# Altium PCB Light_SPT_Device_v1.0.PcbDoc (part 1 of 4)
Units mil, origin at the board's own origin, x right, y up, seen from the top; angles counter-clockwise.
Board outline 3454 x 2460 mil, 2 copper layers (Top Layer, Bottom Layer), stack 57 mil thick; 156 components, 115 nets, 552 pads, 270 vias.
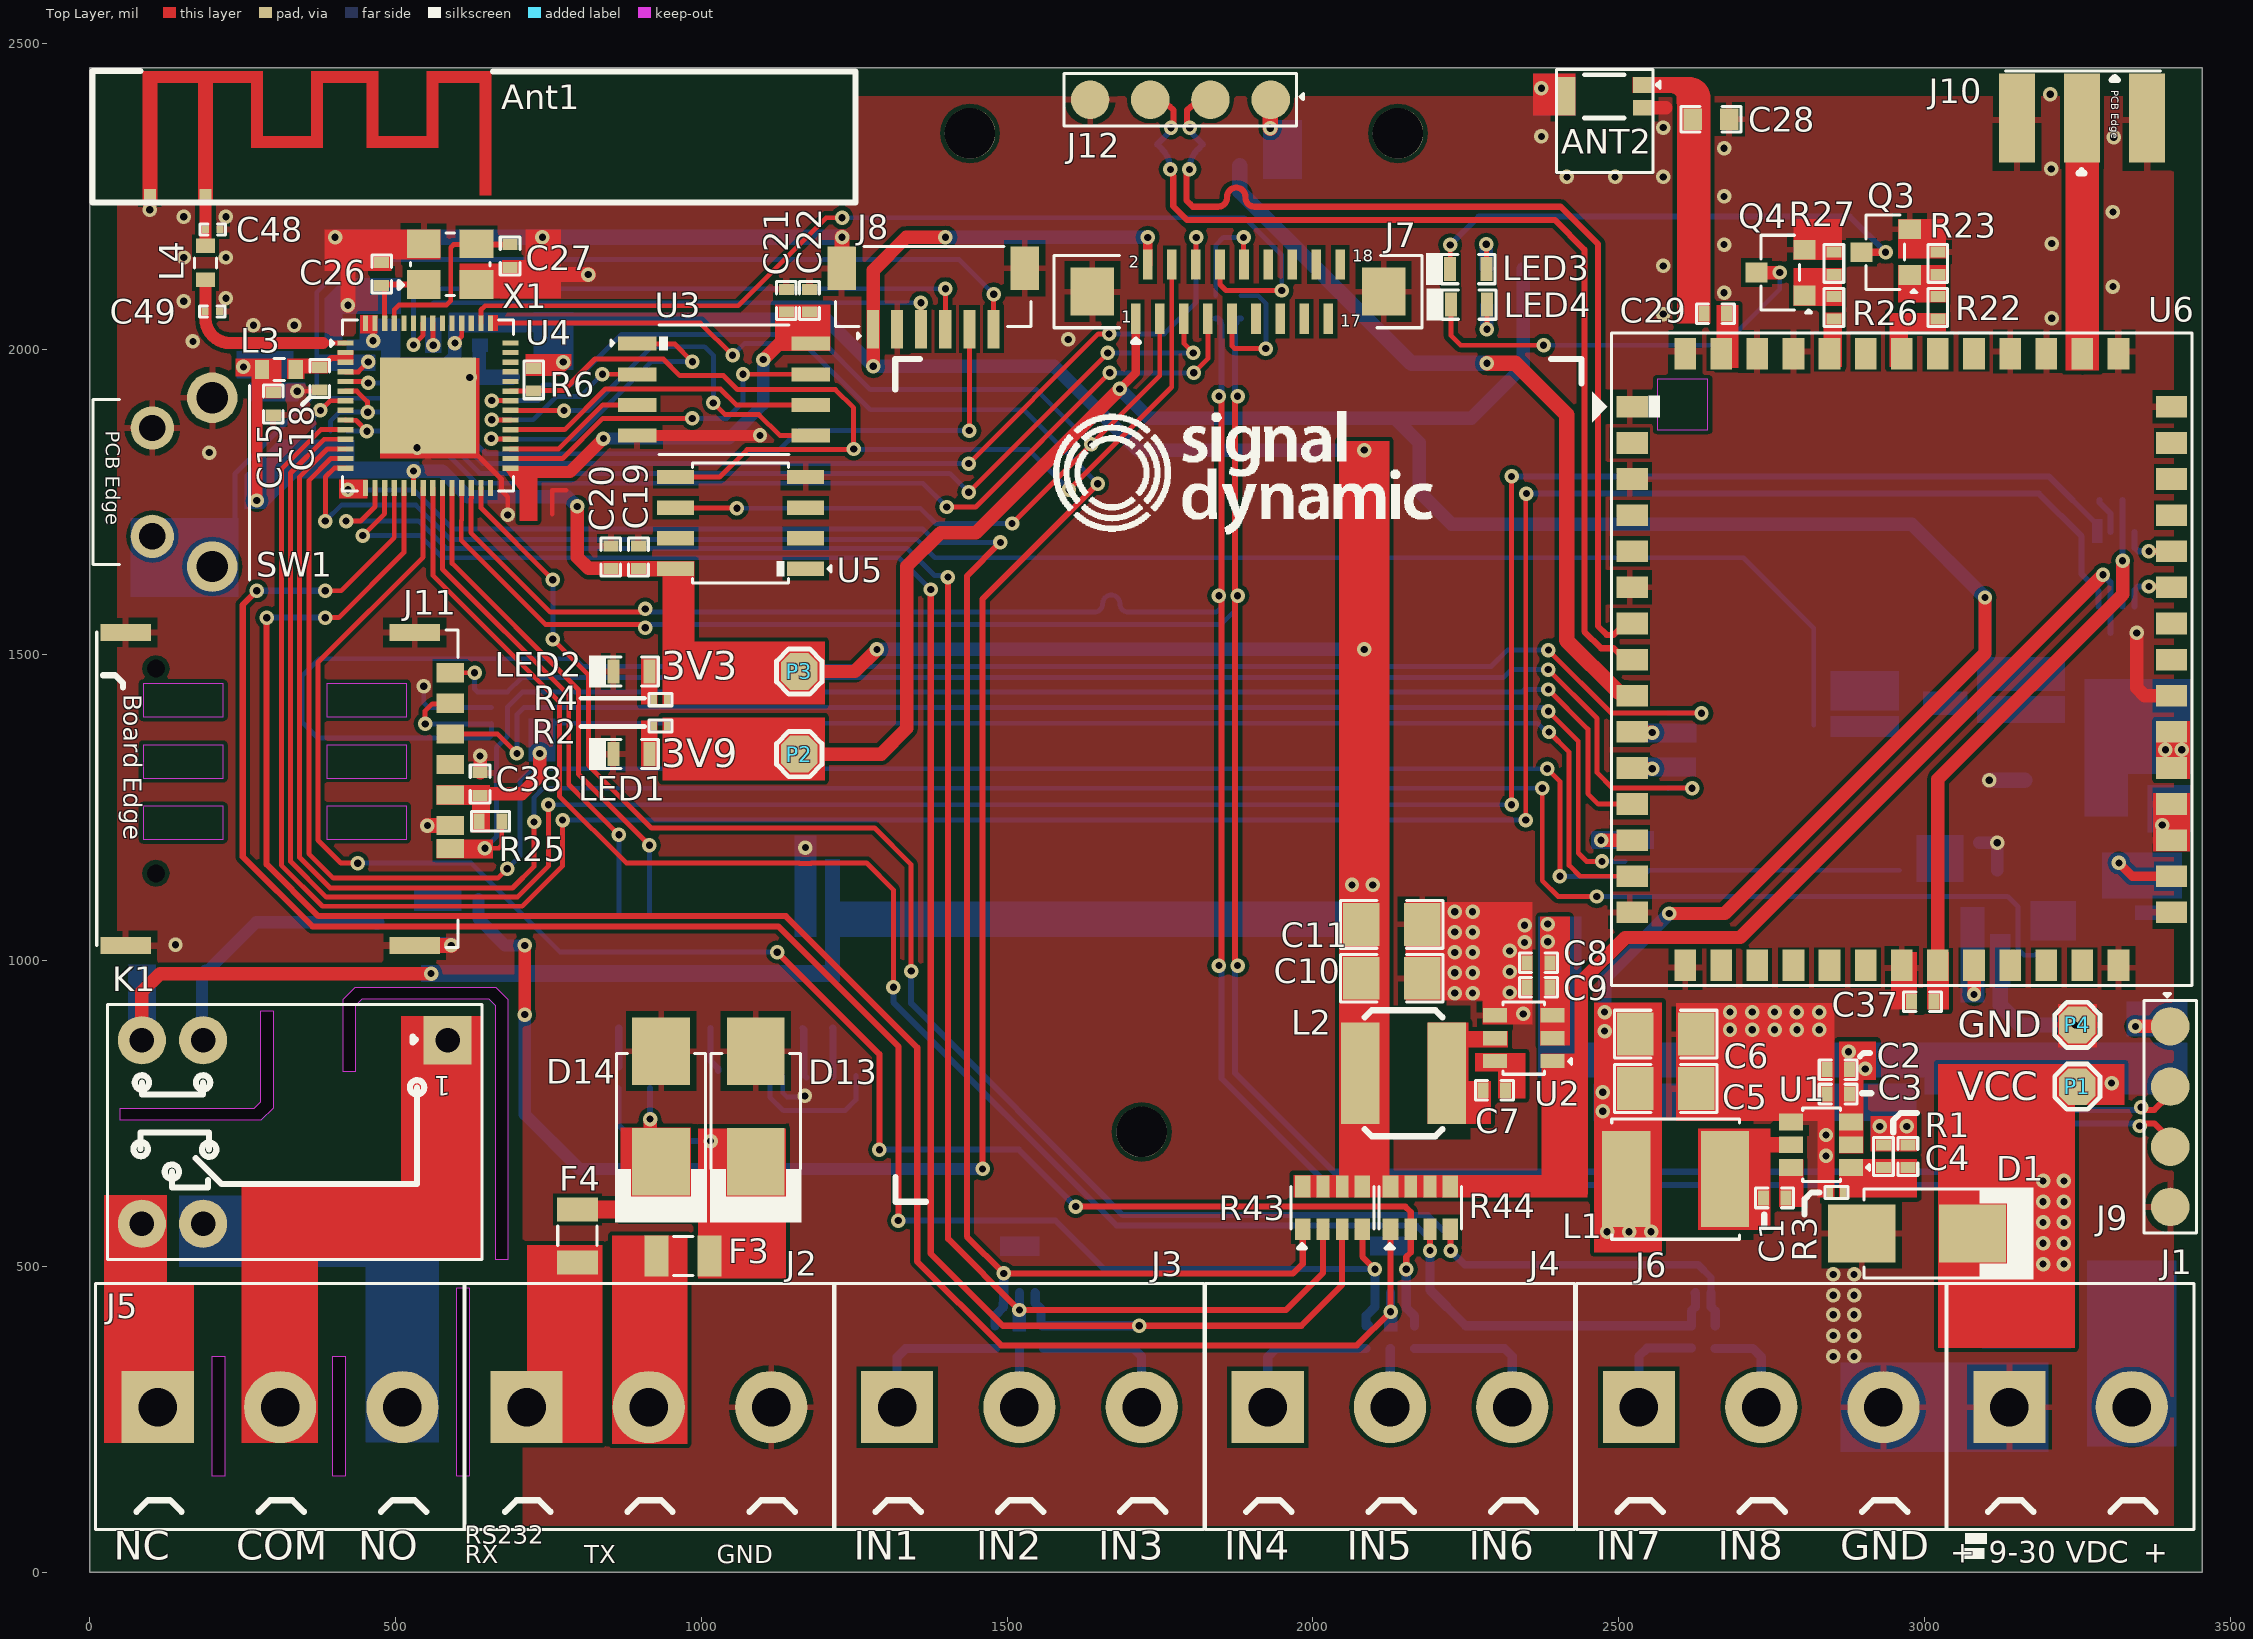
[diagram p0: Top Layer view]
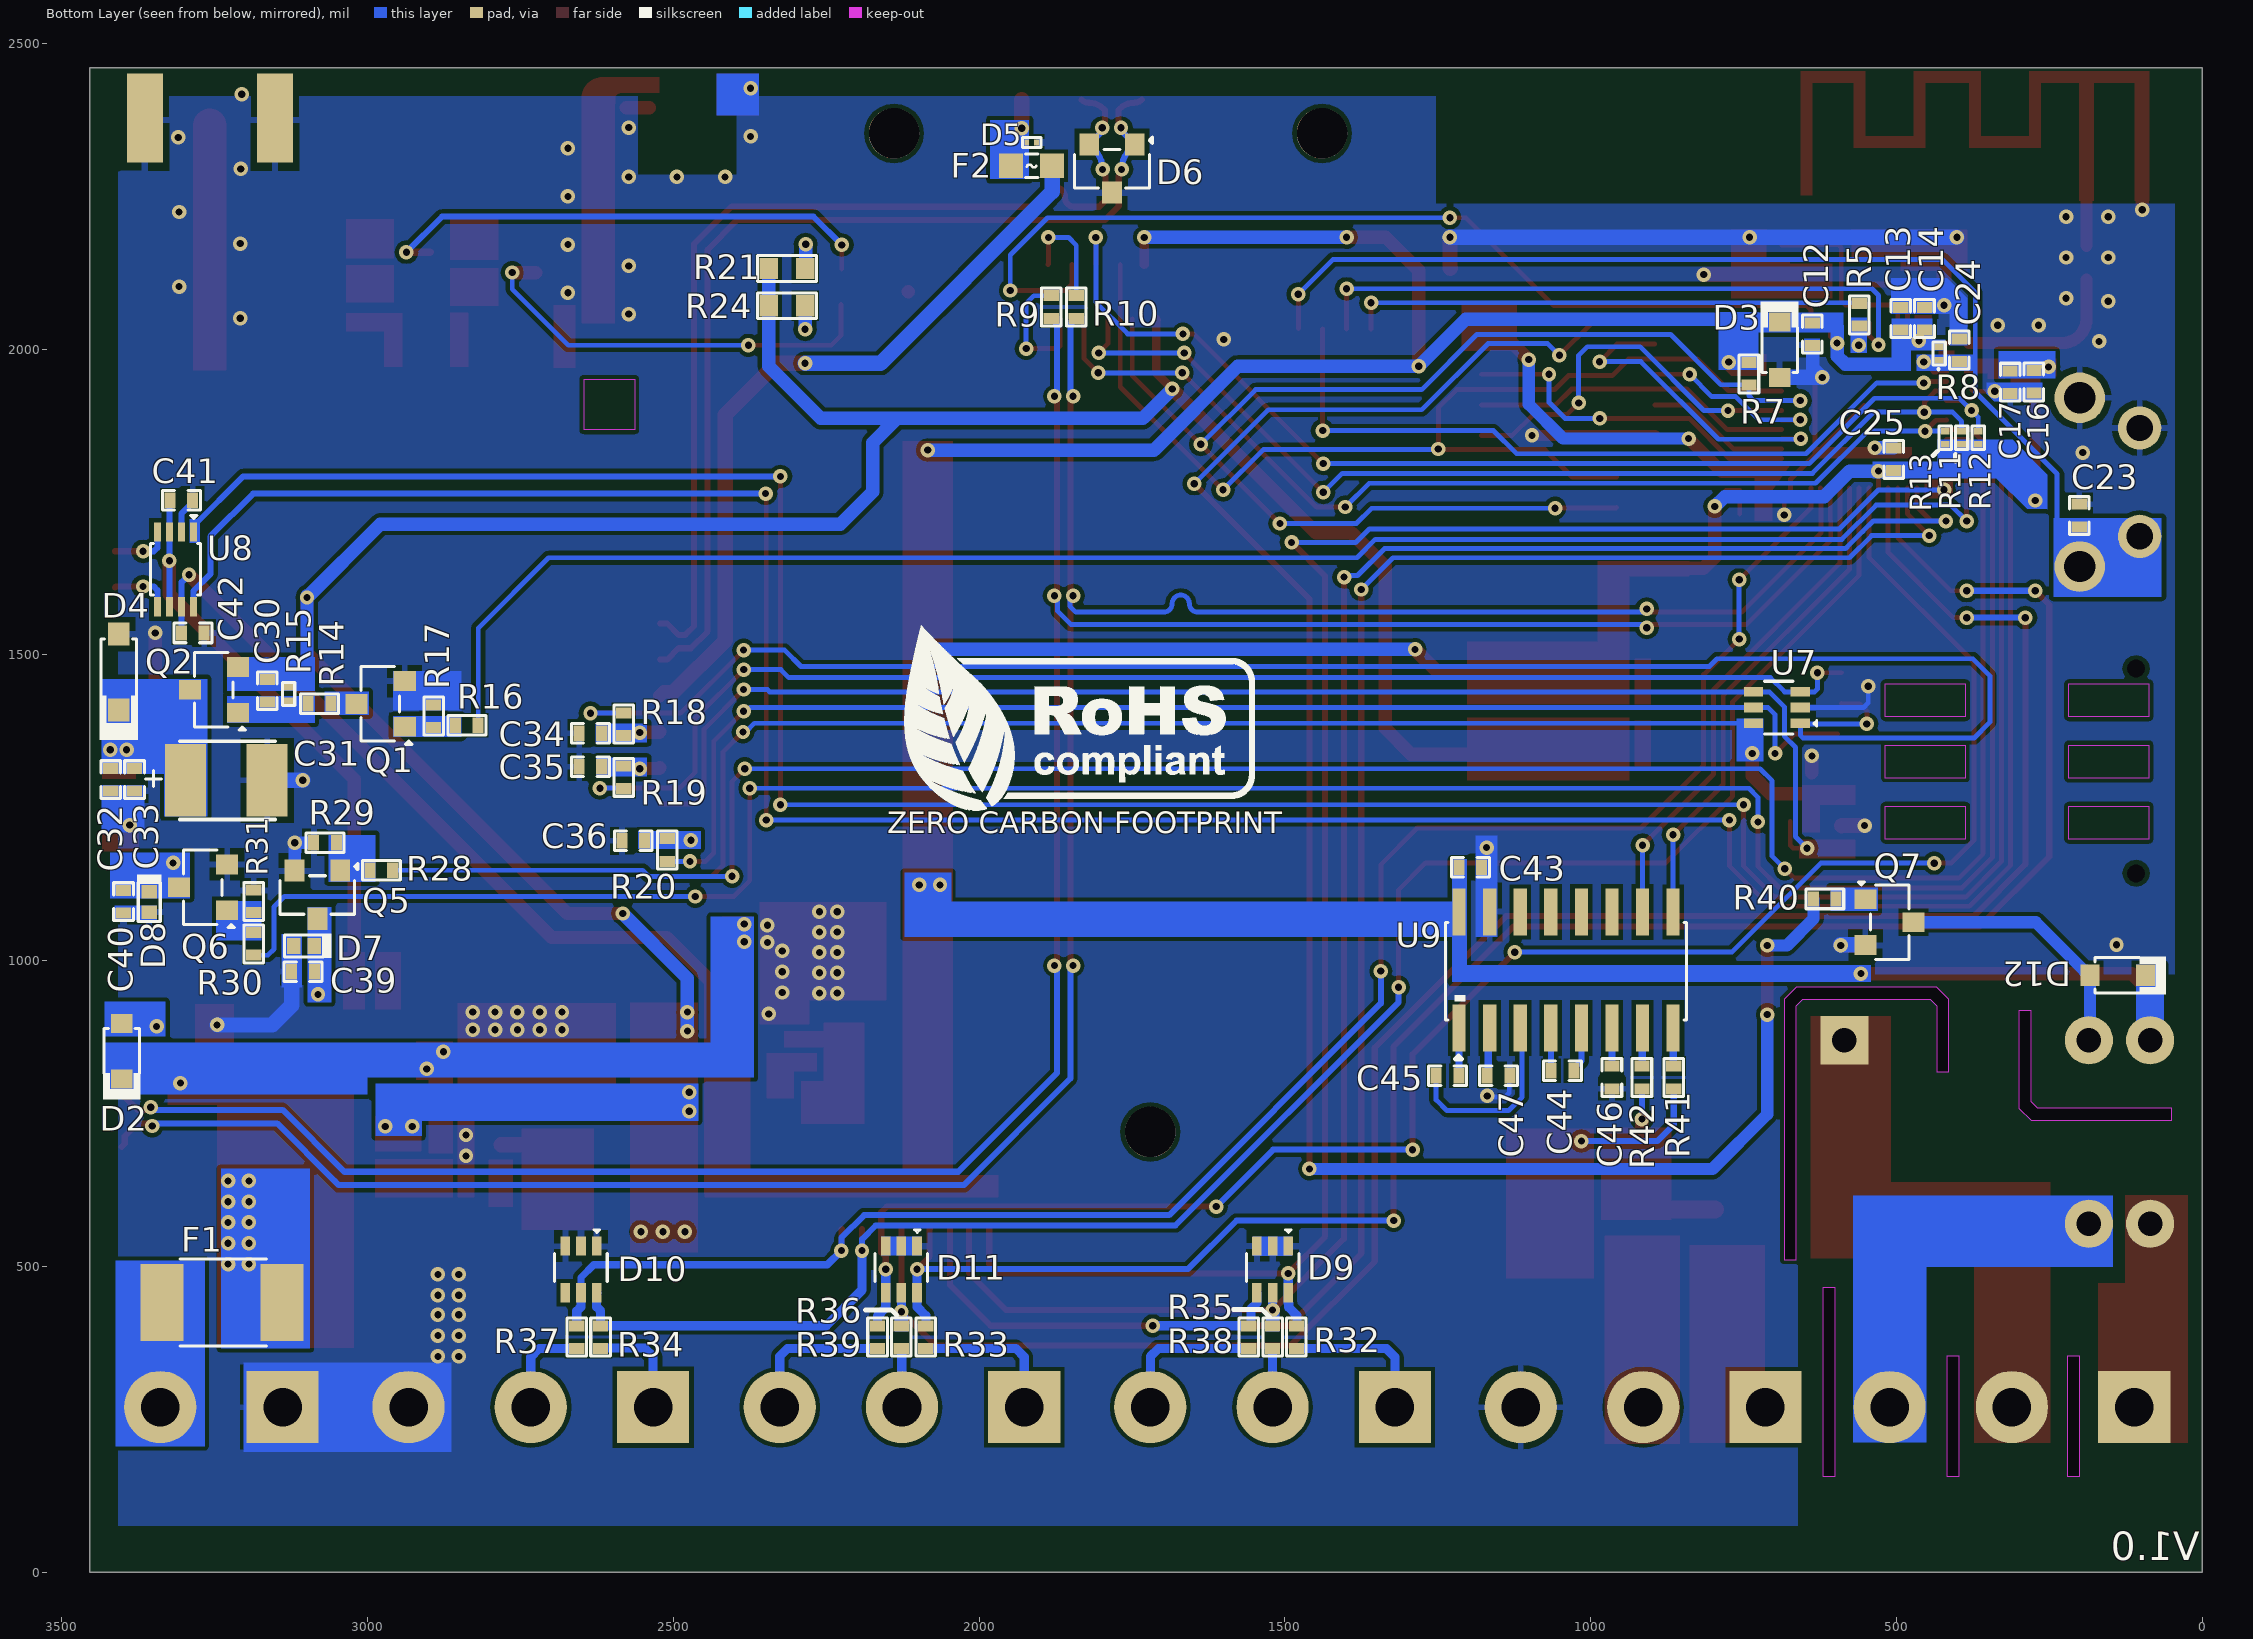
[diagram p1: Bottom Layer view, seen from below]

## Layer stack, top to bottom
Top Solder: solder mask 3, Solder Resist, Dk 3.5
Top Layer: signal copper 10
Dielectric 1: core 37, FR-4, Dk 4.8
Bottom Layer: signal copper 10
Bottom Solder: solder mask 3, Solder Resist, Dk 3.5

## Board outline
0,0 0,2460 3454,2460 3454,0
cut-out: 600.26,157 600.26,465 620.26,465 620.26,157
cut-out: 414.04,818.13 414.04,937.13 433.9,957 663.78,957 683.65,937.13 683.65,511 663.65,511 663.65,926.77 653.28,937.13 444.4,937.13 434.04,926.77 434.04,818.13
cut-out: 49.76,739 49.76,758.87 269.14,758.87 279.5,769.23 279.5,917.82 299.5,917.82 299.5,758.87 279.64,739
cut-out: 220.26,157 200.26,157 200.26,353 220.26,353
cut-out: 417.26,157 397.26,157 397.26,353 417.26,353

## Design rules (kind name [scope] priority, off if disabled: settings)
Clearance [All] p1: gap=7 ignorepadtopadclearanceinfootprint=FALSE except(0: Arc-Hole Track-Hole SMDPad-Hole THPad-Hole Via-Hole Fill-Hole Poly-Hole Region-Hole Text-Hole; 4: Arc-SMDPad Track-SMDPad SMDPad-SMDPad)
DiffPairsRouting USB_DIFF_Routes [InDifferentialPairClass('USB_DIFF_Lines')] p1: maxlimit=12 minlimit=12 mostfreqgap=12 toplayer_minwidth=8 toplayer_maxwidth=10 toplayer_prefwidth=10 bottomlayer_minwidth=8 bottomlayer_maxwidth=10 bottomlayer_prefwidth=10 maxuncoupledlength=500
DiffPairsRouting GSM_USB_Routes [InDifferentialPairClass('GSM_USB_Lines')] p2: maxlimit=12 minlimit=12 mostfreqgap=12 toplayer_minwidth=10 toplayer_maxwidth=10 toplayer_prefwidth=10 bottomlayer_minwidth=10 bottomlayer_maxwidth=10 bottomlayer_prefwidth=10 maxuncoupledlength=500
DiffPairsRouting [All] p3: maxlimit=5 minlimit=5 mostfreqgap=12 toplayer_minwidth=9.5 toplayer_maxwidth=9.5 toplayer_prefwidth=10 bottomlayer_minwidth=9.5 bottomlayer_maxwidth=9.5 bottomlayer_prefwidth=10 impedanceprofiledriven=TRUE impedanceprofileid={B3DCD015-1AF6-4112-AD1C-EA45046023D8} impedanceprofilevalue=90.000000 maxuncoupledlength=500
MatchedLengths "Schematic Matched Net Lengths_1" [InNetClass('GSM_USB')] p1: tolerance=20 checknetsindiffpair=TRUE checkdiffpairvsdiffpair=FALSE checkxsignals=FALSE checkothers=FALSE
MatchedLengths "Schematic Matched Net Lengths" [InNetClass('USB_DIFF')] p2: tolerance=20 checknetsindiffpair=TRUE checkdiffpairvsdiffpair=FALSE checkxsignals=FALSE checkothers=FALSE
MaxMinImpedance "Schematic Impedance Constraint_1" [InNetClass('GSM_USB')] p1: minimum=88.00 maximum=90.00
MaxMinImpedance "Schematic Impedance Constraint" [InNetClass('USB_DIFF')] p2: minimum=85.00 maximum=95.00
MinimumSolderMaskSliver [All] p1: minsoldermaskwidth=0
PolygonConnect [All] p1: thpad.connectstyle=Relief thpad.reliefconductorwidth=10 thpad.reliefentries=4 thpad.polygonreliefangle="90 Angle" thpad.airgapwidth=10 smdpad.connectstyle=Relief smdpad.reliefconductorwidth=10 smdpad.reliefentries=4 smdpad.polygonreliefangle="90 Angle" smdpad.airgapwidth=10 via.connectstyle=Direct via.reliefconductorwidth=10 via.reliefentries=4 via.polygonreliefangle="90 Angle" via.airgapwidth=10
RoutingVias [All] p1: holewidth=11.81 width=23.62 viastyle="Through Hole" minholewidth=11.81 minwidth=23.62 maxholewidth=11.81 maxwidth=23.62
SilkToSilkClearance [All] p1: silktosilkclearance=0
SilkToSolderMaskClearance [IsPad] p1: minsilkscreentomaskgap=0 clearancetoexposedcopper=TRUE
SolderMaskExpansion [All] p1: expansion=4 istentingtop=FALSE
Width Width_2 [InNet('RF_ANT')] p1: maxlimit=55 minlimit=55 preferedwidth=55 impedanceprofiledriven=TRUE impedanceprofileid={DDBBBF64-FD9A-4090-A6F3-67018E91F2E0} impedanceprofilevalue=50.000000 minimp=50.000000 maximp=50.000000 favimp=50.000000
Width Width_1 [InNet('GNSS_ANT')] p2: maxlimit=55 minlimit=55 preferedwidth=55 impedanceprofiledriven=TRUE impedanceprofileid={DDBBBF64-FD9A-4090-A6F3-67018E91F2E0} impedanceprofilevalue=50.000000 minimp=50.000000 maximp=50.000000 favimp=50.000000
Width [All] p3: maxlimit=100 minlimit=8 preferedwidth=22
26 further rules are at their usual default settings.

## Classes and differential pairs
differential pair class USB_DIFF_Lines: USB
differential pair class GSM_USB_Lines: GSM_USB_D
net class USB_DIFF: USB_N USB_P
net class GSM_USB: GSM_USB_D_N GSM_USB_D_P
component class U_Power_Sheet: C1 C2 C3 C4 C5 C6 C7 C8 C9 C10 C11 D1 F1 J1 J2 J3 J4 J5 J6 L1 L2 LED1 LED2 P1 P2 P3 P4 R1 R2 R3 R4 U1 U2
component class U_GSM_Sheet: ANT2 C28 C29 C30 C31 C32 C33 C34 C35 C36 C37 C38 C39 C40 C41 C42 D4 D5 D6 D7 D8 F2 J10 J11 J12 LED3 LED4 Q1 Q2 Q3 Q4 Q5 Q6 R14 R15 R16 R17 R18 R19 R20 R21 R22 R23 R24 R25 R26 R27 R28 R29 R30 R31 S U6 U7 U8
component class U_GPIOs_Relay_Rs232_Sheet: C43 C44 C45 C46 C47 D9 D10 D11 D12 D13 D14 F3 F4 K1 Q7 R32 R33 R34 R35 R36 R37 R38 R39 R40 R41 R42 R43 R44 U9
component class U_Controller_Sheet: Ant1 C12 C13 C14 C15 C16 C17 C18 C19 C20 C21 C22 C23 C24 C25 C26 C27 C48 C49 D2 D3 J7 J8 J9 L3 L4 R5 R6 R7 R8 R9 R10 R11 R12 R13 sS SW1 U3 U4 U5 X1
differential pair USB: +USB_P -USB_N
differential pair GSM_USB_D: +GSM_USB_D_P -GSM_USB_D_N

## Components (designator, comment, footprint, x,y, rotation, side; value= is the part's Value field where it differs from the comment)
Ant1 "ESP Patch Anttena" "ESP Patch Antenna" 86,2242 r0 top locked net-tie
ANT2 "W3011" W3011 2476.48,2413.43 r0 top locked
C1 "0.1uf" Cap-0402 2755,612 r0 top locked
C2 "10uF" Cap-0402 2859,822 r0 top locked
C3 "0.1uf" Cap-0402 2859,782 r0 top locked
C4 "100pF" Cap-0402 2973,680 r90 top locked
C5 "22uF" Cap-1206 2577,791 r180 top locked
C6 "22uF" Cap-1206 2577,880 r180 top locked
C7 "0.1uf" Cap-0402 2296.76,788.4 r0 top locked
C8 "10uF" Cap-0402 2368.76,996.4 r0 top locked
C9 "0.1uf" Cap-0402 2368.76,956.4 r0 top locked
C10 "22uF" Cap-1206 2128.76,971.4 r180 top locked
C11 "22uF" Cap-1206 2128.76,1059.4 r180 top locked
C12 "0.1uf" Cap-0402 637.71,2024.7 r90 bottom locked
C13 "1uF" Cap-0402 493,2050 r270 bottom locked
C14 "10nF" Cap-0402 454,2050 r270 bottom locked
C15 "10uF" Cap-0402 300,1910.5 r90 top
C16 "1uF" Cap-0402 275,1946.5 r90 bottom locked
C17 "0.1uf" Cap-0402 314,1946 r90 bottom locked
C18 "0.1uf" Cap-0402 376,1952 r90 top
C19 "0.1uf" Cap-0402 897,1660 r270 top locked
C20 "10uF" Cap-0402 852,1660 r270 top locked
C21 "1uF" Cap-0402 1139,2079.5 r270 top
C22 "0.1uf" Cap-0402 1176.64,2079.5 r270 top
C23 "0.1uf" Cap-0402 201,1728 r270 bottom locked
C24 "1uF" Cap-0402 397,1998.5 r270 bottom locked
C25 "0.1uf" Cap-0402 504,1820 r270 bottom locked
C26 "22PF" Cap-0402 477,2123 r270 top locked value=22pF
C27 "22PF" Cap-0402 687,2152.5 r90 top locked value=22pF
C28 "2.2pF" Cap-0603 2651,2376 r180 top locked
C29 "33pF" Cap-0402 2658,2058 r180 top locked
C30 "22nF" Cap-0402 3164,1441.5 r90 bottom locked
C31 "220uF" Case-B 3231.07,1295 r180 bottom locked
C32 "0.1uf" Cap-0402 3420,1296 r90 bottom locked
C33 "1uF" Cap-0402 3381,1296 r90 bottom locked
C34 "22PF" Cap-0402 2635.5,1372 r180 bottom locked value=22pF
C35 "22PF" Cap-0402 2635.5,1317 r180 bottom locked value=22pF
C36 "22PF" Cap-0402 2565.5,1196 r180 bottom locked value=22pF
C37 "0.1uf" Cap-0402 2997,933 r180 top locked
C38 "0.1uf" Cap-0402 638,1289 r90 top locked
C39 "0.1uf" Cap-0402 3105.5,982 r180 bottom locked
C40 "0.1uf" Cap-0402 3399,1096.5 r90 bottom locked
C41 "0.1uf" Cap-0402 3304.5,1753 r180 bottom locked
C42 "0.1uf" Cap-0402 3285.66,1536 r180 bottom locked
C43 "0.1uf" Cap-0402 1196.5,1153 r180 bottom locked
C44 "0.1uf" Cap-0402 1046,820 r180 bottom
C45 "0.1uf" Cap-0402 1234,812 r0 bottom locked
C46 "0.1uf" Cap-0402 965,809 r270 bottom locked
C47 "0.1uf" Cap-0402 1150.5,812 r180 bottom locked
C48 "2.7pF" CAP-0201 200.81,2196 r180 top
C49 "4.7pF" CAP-0201 200.03,2062 r180 top
D1 "SMBJ36CA" SMB_ 2988,554 r0 top locked
D2 "1N4148WS-7-F" SOD-323 3402,852 r90 bottom locked
D3 "UDD32C03L01" SOD-323 690.71,1999.2 r270 bottom locked
D4 "MMSZ5231BT1G" SOD-123 3407,1472 r270 bottom locked
D5 "PESD5V0H1BSFYL" DSN0603-2 1914,2338 r0 bottom
D6 "ESD5302F-3/TR" Sot-23 1782.6,2295.63 r0 bottom locked
D7 "ESD5651N-2/TR" DFN1006-2L_ 3104,1024 r0 bottom locked
D8 "ESD5651N-2/TR" DFN1006-2L_ 3357,1096 r270 bottom locked
D9 "BZX84C3V3TS-7-F" SOT-363 1520,495.19 r270 bottom locked
D10 "BZX84C3V3TS-7-F" SOT-363 2651,495.19 r270 bottom locked
D11 "BZX84C3V3TS-7-F" SOT-363 2127,495.19 r270 bottom locked
D12 "1N4148WS-7-F" SOD-323 138,976 r0 bottom
D13 "SMBJ26CA" SMB_ 1089,761.55 r270 top locked
D14 "SMBJ26CA" SMB_ 934,761.55 r270 top locked
F1 "BSMD1812-150-33V" Fuse-1812_ 3238,441 r180 bottom locked
F2 "SMD0603-050" Fuse-0603 1914,2300 r0 bottom
F3 "SMD0805P020TF" Fuse-0805 970,517 r0 top locked
F4 "SMD0805P020TF" Fuse-0805 797,550 r90 top locked
J1 "DB128L-5.08-2P-BK-S" DB128L-5.08-2P-BK-S 3239,270 r0 top locked
J2 "DB128L-5.08-3P-BK-S" DB128L-5.08-3P-BK-S 914,270 r0 top locked
J3 "DB128L-5.08-3P-BK-S" DB128L-5.08-3P-BK-S 1520,270 r0 top locked
J4 "DB128L-5.08-3P-BK-S" DB128L-5.08-3P-BK-S 2126,270 r0 top locked
J5 "DB128L-5.08-3P-BK-S" DB128L-5.08-3P-BK-S 311,270 r0 top locked
J6 "DB128L-5.08-3P-BK-S" DB128L-5.08-3P-BK-S 2733,270 r0 top locked
J7 "F0503-ZV-18-20T-R" F0503-ZV-18-20T-R 1877.46,2094.13 r0 top locked
J8 "Voltlink Target" "Voltlink Target" 1379.06,2082.7 r0 top locked
J9 "POGO Connector 4 Pin" "Pogo 4 Pin" 3402,745 r270 top
J10 "SMA Jack" CON-SMA-EDGE_S 3151.33,2378.26 r270 top locked
J11 "XKNANO-113" XKNANO-113 324.14,1280.8 r270 top locked
J12 "POGO Connector 4 Pin" "Pogo 4 Pin" 1783.21,2408 r180 top locked
K1 "J102K1CS33VDC.20" J102K1CS33VDC.20 585,870 r180 top
L1 "10uH" VLS5045EX-100M-H 2593,643 r180 top locked
L2 "6.8uH" LVC505040-6R8M-N_ 2148.13,816 r180 top locked
L3 "2nH" "IND-0603 (1608 Metric)" 309,1967 r0 top
L4 "1.6nH" "IND-0603 (1608 Metric)" 189,2141.44 r270 top
LED1 "RED" LED-0603 885.4,1338 r180 top locked
LED2 "RED" LED-0603 885.4,1473 r180 top locked
LED3 "Yellow" LED-0603 2254,2131 r180 top locked
LED4 "RED" LED-0603 2255,2073 r180 top locked
P1 "TEST POINT" Test-point 3250,794 r0 top locked
P2 "TEST POINT" Test-point 1160,1338 r180 top locked
P3 "TEST POINT" Test-point 1160,1473 r180 top locked
P4 "TEST POINT" Test-point 3250,895 r0 top locked
Q1 "MMBT2222A-7-F" SOT-23 2978.63,1420 r90 bottom locked
Q2 "WPM2015-3/TR" Sot-23 3251,1443 r90 bottom locked
Q3 "MMBT2222A-7-F" SOT-23 2936.63,2158.6 r90 top locked
Q4 "MMBT2222A-7-F" SOT-23 2764.63,2125.4 r90 top locked
Q5 "MMBT2222A-7-F" SOT-23 3082,1108 r0 bottom locked
Q6 "MMBT2222A-7-F" SOT-23 3269,1120 r90 bottom locked
Q7 "MMBT2222A-7-F" SOT-23 511.14,1063 r270 bottom locked
R1 "39K" Res-0402 2933,680 r90 top locked
R2 "470R" Res-0201 933,1384 r0 top locked
R3 "10K" Res-0201 2856,621 r0 top locked
R4 "470R" Res-0201 933,1427 r0 top locked
R5 "499R" Res-0402 560.74,2056.18 r90 bottom locked
R6 "4.7K" Res-0402 725.59,1949.96 r90 top locked
R7 "4.7K" Res-0402 741,1959.75 r90 bottom locked
R8 "10K" Res-0201 430,1993 r90 bottom locked
R9 "0R" Res-0402 1882,2069 r270 bottom locked
R10 "0R" Res-0402 1841,2069 r270 bottom locked
R11 "10K" Res-0201 393.25,1855.17 r270 bottom locked
R12 "10K" Res-0201 366,1855.17 r270 bottom locked
R13 "10K" Res-0201 420,1855.17 r270 bottom locked
R14 "1K" Res-0402 3078.5,1420 r180 bottom locked
R15 "10K" Res-0201 3129,1436.17 r90 bottom locked
R16 "4.7K" Res-0402 2837.5,1385 r180 bottom locked
R17 "47K" Res-0402 2892,1400 r270 bottom locked
R18 "22R" Res-0402 2581,1387 r270 bottom locked
R19 "0R" Res-0402 2581,1300 r90 bottom locked
R20 "22R" Res-0402 2510,1181 r90 bottom locked
R21 "180R" Res-0603 2314,2132 r180 bottom locked
R22 "4.7K" Res-0402 3022,2068 r90 top locked
R23 "47K" Res-0402 3022,2140.5 r270 top locked
R24 "180R" Res-0603 2314,2071 r180 bottom locked
R25 "4.7K" Res-0402 655,1228 r0 top locked
R26 "4.7K" Res-0402 2852,2068 r90 top locked
R27 "47K" Res-0402 2852,2140.5 r270 top locked
R28 "4.7K" Res-0402 2977.5,1148 r180 bottom locked
R29 "47K" Res-0402 3069.5,1193 r180 bottom locked
R30 "4.7K" Res-0402 3186,1027.5 r270 bottom locked
R31 "47K" Res-0402 3186,1097 r270 bottom locked
R32 "4.7K" Res-0402 1481,384.5 r90 bottom locked
R33 "4.7K" Res-0402 2087,384.5 r90 bottom locked
R34 "4.7K" Res-0402 2619,384.5 r90 bottom locked
R35 "4.7K" Res-0402 1520,384.5 r90 bottom locked
R36 "4.7K" Res-0402 2127,384.5 r90 bottom locked
R37 "4.7K" Res-0402 2658,384.5 r90 bottom locked
R38 "4.7K" Res-0402 1559,384.5 r90 bottom locked
R39 "4.7K" Res-0402 2166,384.5 r90 bottom locked
R40 "4.7K" Res-0402 617,1101 r180 bottom locked
R41 "22R" Res-0402 864,809 r90 bottom locked
R42 "22R" Res-0402 916,809 r90 bottom locked
R43 "100K" YC164-JR-070RL 2032.06,595.84 r90 top locked
R44 "100K" YC164-JR-070RL 2175.63,595.84 r90 top locked
SW1 "1825027-8" 1825027-8 151.02,1782.58 r270 top locked
U1 "AP63200WU-7" TSOT-26-6 2831,699 r180 top locked
U2 "AP63203WU-7" TSOT-23-6 2344.76,873.4 r180 top locked
U3 "W25Q64JVSSIQ TR" "SOIC-8 (208 mil)" 1036.93,1934 r0 top locked
U4 "ESP32-S3R8" "56-QFN (7x7)" 552.87,1907.84 r0 top locked
U5 "ATECC608B-SSHDA-B" SOIC-8 1064,1716 r180 top locked
U6 "SIM7500E" SIM7500E 2522,1905.77 r0 top locked
U7 "SMF05CT1G-ES" SOT-363 695.19,1414 r0 bottom
U8 "TXB0102DCUT" VSSOP-8(2x2.3x0.5) 3314.16,1640.02 r270 bottom locked
U9 "MAX3232IDR" SOIC-16 1040,985 r90 bottom locked
X1 "40MHz" X322540MPB4SI_ 589,2139 r0 top locked value=40MHZ

## Footprints (in the part's own frame and the unit in brackets; to place one, negate y for a bottom-side part, rotate by r counter-clockwise, add the part's x,y. Pads: shape width x height; smd on the part's side, far side on the other; paste and mask are expansions set on the pad)
"56-QFN (7x7)" [mm]
  rect 0.65x0.22 smd: 1(-3.425,2.6) 2(-3.425,2.2) 3(-3.425,1.8) 4(-3.425,1.4) 5(-3.425,1) 6(-3.425,0.6) 7(-3.425,0.2) 8(-3.425,-0.2) 9(-3.425,-0.6) 10(-3.425,-1) 11(-3.425,-1.4) 12(-3.425,-1.8) 13(-3.425,-2.2) 14(-3.425,-2.6) 29(3.425,-2.6) 30(3.425,-2.2) 31(3.425,-1.8) 32(3.425,-1.4) 33(3.425,-1) 34(3.425,-0.6) 35(3.425,-0.2) 36(3.425,0.2) 37(3.425,0.6) 38(3.425,1) 39(3.425,1.4) 40(3.425,1.8) 41(3.425,2.2) 42(3.425,2.6)
  rect 0.22x0.65 smd: 15(-2.6,-3.425) 16(-2.2,-3.425) 17(-1.8,-3.425) 18(-1.4,-3.425) 19(-1,-3.425) 20(-0.6,-3.425) 21(-0.2,-3.425) 22(0.2,-3.425) 23(0.6,-3.425) 24(1,-3.425) 25(1.4,-3.425) 26(1.8,-3.425) 27(2.2,-3.425) 28(2.6,-3.425) 43(2.6,3.425) 44(2.2,3.425) 45(1.8,3.425) 46(1.4,3.425) 47(1,3.425) 48(0.6,3.425) 49(0.2,3.425) 50(-0.2,3.425) 51(-0.6,3.425) 52(-1,3.425) 53(-1.4,3.425) 54(-1.8,3.425) 55(-2.2,3.425) 56(-2.6,3.425)
  rect 4x4 smd: 57(0,0)
  silkscreen extent -4.04,-3.56 3.56,3.56, body extent -3.5,-3.51 3.5,3.49, height 0.92
1825027-8 [mm]
  round 1.8 hole 1.1: 1(-2.25,-1.245) 2(2.25,-1.245)
  round 2.1 hole 1.3: 3(3.505,1.245) 4(-3.505,1.245)
  silkscreen extent -4.01,-3.71 4.06,2.79, body extent -4.18,-7.11 4.23,2.73, height 6.98
CAP-0201 [mm]
  rect 0.3x0.3 smd mask+0.055: 1(-0.3,0) 2(0.3,0)
  silkscreen extent -0.53,-0.23 0.53,0.23, body extent -0.3,-0.15 0.3,0.15, height 0.28
Cap-0402 [mil]
  rect 18x25 smd mask+2.36: 1(-18.5,0) 2(18.5,0)
  silkscreen extent -31,-16 31,16, body extent -20,-10 20,10, height 19
Cap-0603 [mil]
  rect 30x35 smd mask+2.36: 1(-30,0) 2(30,0)
  silkscreen extent -49,-21 49,21, body extent -32,-16 31,16, height 34
Cap-1206 [mil] "SMD 1206"
  rect 60x70 smd: 1(-50,0) 2(50,0)
  silkscreen extent -84,-39 84,39, body extent -63,-31 63,32, height 39
Case-B [mm]
  rect 1.7x3 smd paste+0: 1(-1.7,0) 2(1.7,0)
  silkscreen extent -3.35,-1.63 2.03,1.63, body extent -1.85,-1.5 1.85,1.5, height 2.16
CON-SMA-EDGE_S [mm]
  rect 3.7x1.5 smd: 1(0,2.7) 2(0,0) 3(0,5.4)
  rect 3.7x1.5 smd far side: 4(0,5.4) 5(0,0)
  silkscreen extent -1.96,-0.48 2.3,5.97, body extent -11.32,-0.42 2.01,5.93, height 3.55
DB128L-5.08-2P-BK-S [mm]
  rect 3x3 hole 1.6: 1(-2.54,0)
  round 3 hole 1.6: 2(2.54,0)
  silkscreen extent -5.13,-5.08 5.13,5.13, body extent -5.08,-5.03 5.13,5.07, height 10.3
DB128L-5.08-3P-BK-S [mm]
  rect 3x3 hole 1.6: 1(-5.08,0)
  round 3 hole 1.6: 2(0,0) 3(5.08,0)
  silkscreen extent -7.67,-5.08 7.67,5.13, body extent -7.59,-5.03 7.65,5.07, height 10.1
DFN1006-2L_ [mm]
  rect 0.55x0.66 smd: 1(-0.425,0) 2(0.425,0)
  silkscreen extent -1.14,-0.51 0.81,0.51, body extent -0.5,-0.3 0.5,0.3, height 0.47
DSN0603-2 [mm]
  rect 0.2x0.24 smd mask+0.055: 1(-0.2,0) 2(0.2,0)
  silkscreen extent -0.38,-0.2 0.38,0.2, body extent -0.3,-0.15 0.3,0.15, height 0.32
"ESP Patch Antenna" [mil]
  rect 19.68x19.68 smd: ANT#(103,10) GND(12,10)
  Top Layer region: 0,0 24.8,0 24.8,194 0,194
  Top Layer region: 196.84,193.31 196.84,213 -0.01,213 -0.01,193.31
  Top Layer region: 90.55,0 115.35,0 115.35,198 90.55,198
  Top Layer region: 177.17,87.01 196.85,87.01 196.85,198 177.17,198
  Top Layer region: 281,87.01 281,106.69 192,106.69 192,87.01
  Top Layer region: 295.28,198 275.59,198 275.59,87.01 295.28,87.01
  Top Layer region: 275.59,212.99 275.59,193.31 385.83,193.31 385.83,212.99
  Top Layer region: 366.14,87.01 385.83,87.01 385.83,198 366.14,198
  Top Layer region: 471,87.01 471,106.69 380,106.69 380,87.01
  Top Layer region: 484.25,199 464.57,199 464.57,87.01 484.25,87.01
  Top Layer region: 464.56,213 464.56,193.31 570.85,193.31 570.85,213
  Top Layer region: 551.19,9.46 570.87,9.46 570.87,199.01 551.19,199.01
F0503-ZV-18-20T-R [mm]
  rect 0.4x1.25 smd: 1(-4.25,-1.125) 1(-4.25,-1.125) 2(-3.75,1.125) 3(-3.25,-1.125) 4(-2.75,1.125) 5(-2.25,-1.125) 6(-1.75,1.125) 7(-1.25,-1.125) 8(-0.75,1.125) 9(-0.25,-1.125) 10(0.25,1.125) 11(0.75,-1.125) 12(1.25,1.125) 13(1.75,-1.125) 14(2.25,1.125) 15(2.75,-1.125) 16(3.25,1.125) 17(3.75,-1.125) 18(4.25,1.125)
  rect 1.8x2 smd: MP1(-6.05,0) MP2(6.05,0)
  silkscreen extent -7.65,-2.11 7.65,1.5, body extent -7.6,-1.5 7.6,1.46, height 4.61
Fuse-0603 [mm]
  rect 1x1 smd: 1(-0.85,0) 2(0.85,0)
  silkscreen extent -0.25,-0.48 0.25,0.48, body extent -0.77,-0.42 0.78,0.43, height 0.45
Fuse-0805 [mm]
  rect 1x1.7 smd: 1(-1.1,0) 2(1.1,0)
  silkscreen extent -0.41,-0.81 0.41,0.81, body extent -1.1,-0.75 1.1,0.75, height 1.24
Fuse-1812_ [mm]
  rect 1.78x3.2 smd: 1(-2.49,0) 2(2.49,0)
  silkscreen extent -1.75,-1.8 1.85,1.8, body extent -2.36,-1.74 2.37,1.74, height 1.03
"IND-0603 (1608 Metric)" [mm] "0.063\" L x 0.032\" W (1.60mm x 0.80mm)"
  rect 0.6x0.8 smd: 1(-0.7,0) 2(0.7,0)
  silkscreen extent -0.2,-0.46 0.23,0.46, body extent -0.8,-0.4 0.8,0.4, height 0.78
J102K1CS33VDC.20 [mm]
  rect 2x2 hole 1.02: 1(0,0)
  round 2 hole 1.02: 2(10.16,7.62) 3(12.7,7.62) 4(10.16,0) 5(12.7,0)
  silkscreen extent -1.42,-1.48 14.12,9.1, body extent -1.42,-1.48 14.12,9.1, height 11.8
LED-0603 [mm]
  rect 0.5x1 smd: 1(-0.75,0) 2(0.75,0)
  silkscreen extent -1.12,-0.66 1.75,0.66, body extent -0.82,-0.37 0.82,0.36, height 0.68
LVC505040-6R8M-N_ [mm]
  rect 1.6x4.2 smd: 1(-1.8,0) 2(1.8,0)
  silkscreen extent -1.61,-2.62 1.61,2.62, body extent -2.5,-2.5 2.5,2.5, height 2
"Pogo 4 Pin" [mm]
  round 1.6 smd: 1(-3.75,0) 2(-1.25,0) 3(1.25,0) 4(3.75,0)
  silkscreen extent -5.11,-1.09 4.83,1.09
Res-0201 [mm]
  rect 0.27x0.37 smd mask+0.055: 1(-0.275,0) 2(0.275,0)
  silkscreen extent -0.48,-0.25 0.48,0.25, body extent -0.3,-0.15 0.3,0.15, height 0.29
Res-0402 [mil]
  rect 18x25 smd mask+2.17: 1(-18.5,0) 2(18.5,0)
  silkscreen extent -32,-17 32,16, body extent -23,-11 23,11, height 16
Res-0603 [mil]
  rect 30x35 smd: 1(-30,0) 2(30,0)
  silkscreen extent -48,-21 48,21, body extent -31,-17 31,17, height 18
SIM7500E [mm]
  rect 1.3x0.9 smd: 1(0,0) 2(0,-1.5) 3(0,-3) 4(0,-4.5) 5(0,-6) 6(0,-7.5) 7(0,-9) 8(0,-10.5) 9(0,-12) 10(0,-13.5) 11(0,-15) 12(0,-16.5) 13(0,-18) 14(0,-19.5) 15(0,-21) 29(22.4,-21) 30(22.4,-19.5) 31(22.4,-18) 32(22.4,-16.5) 33(22.4,-15) 34(22.4,-13.5) 35(22.4,-12) 36(22.4,-10.5) 37(22.4,-9) 38(22.4,-7.5) 39(22.4,-6) 40(22.4,-4.5) 41(22.4,-3) 42(22.4,-1.5) 43(22.4,0)
  rect 0.9x1.3 smd: 16(2.2,-23.2) 17(3.7,-23.2) 18(5.2,-23.2) 19(6.7,-23.2) 20(8.2,-23.2) 21(9.7,-23.2) 22(11.2,-23.2) 23(12.7,-23.2) 24(14.2,-23.2) 25(15.7,-23.2) 26(17.2,-23.2) 27(18.7,-23.2) 28(20.2,-23.2) 44(20.2,2.2) 45(18.7,2.2) 46(17.2,2.2) 47(15.7,2.2) 48(14.2,2.2) 49(12.7,2.2) 50(11.2,2.2) 51(9.7,2.2) 52(8.2,2.2) 53(6.7,2.2) 54(5.2,2.2) 55(3.7,2.2) 56(2.2,2.2)
  Keep-Out Layer region: 1.05,-0.96 3.15,-0.96 3.15,1.14 1.05,1.14
  silkscreen extent -1.66,-24.04 23.25,3.06, body extent -0.81,-23.99 23.19,3.01, height 2.82
SMB_ [mm]
  rect 2.8x2.4 smd: 1(-2.3,0) 2(2.3,0)
  silkscreen extent -2.21,-1.91 4.83,1.9, body extent -2.7,-1.8 2.7,1.8, height 2.3
SOD-123 [mm]
  rect 0.95x0.9 smd: 1(-1.575,0) 2(1.575,0)
  silkscreen extent -1.37,-0.8 2.82,0.8, body extent -1.82,-0.77 1.83,0.78, height 1.5
SOD-323 [mm]
  rect 0.8x0.9 smd mask+0.055: 1(-1.15,0) 2(1.15,0)
  silkscreen extent -2.01,-0.79 0.94,0.79, body extent -1.3,-0.67 1.3,0.67, height 1.1
SOIC-8 [mm]
  rect 1.55x0.6 smd: 1(-2.7,1.905) 2(-2.7,0.635) 3(-2.7,-0.635) 4(-2.7,-1.905) 5(2.7,-1.905) 6(2.7,-0.635) 7(2.7,0.635) 8(2.7,1.905)
  silkscreen extent -3.76,-2.49 1.99,2.49, body extent -3,-2.45 3,2.45, height 1.7
"SOIC-8 (208 mil)" [mm]
  rect 1.61x0.58 smd: 1(-3.605,1.905) 2(-3.605,0.635) 3(-3.605,-0.635) 4(-3.605,-1.905) 5(3.605,-1.905) 6(3.605,-0.635) 7(3.605,0.635) 8(3.605,1.905)
  silkscreen extent -4.7,-2.69 2.69,2.69, body extent -3.95,-2.64 3.95,2.64, height 2.16
SOIC-16 [mm]
  rect 1.95x0.55 smd: 1(-2.41,4.445) 2(-2.41,3.175) 3(-2.41,1.905) 4(-2.41,0.635) 5(-2.41,-0.635) 6(-2.41,-1.905) 7(-2.41,-3.175) 8(-2.41,-4.445) 9(2.41,-4.445) 10(2.41,-3.175) 11(2.41,-1.905) 12(2.41,-0.635) 13(2.41,0.635) 14(2.41,1.905) 15(2.41,3.175) 16(2.41,4.445)
  silkscreen extent -3.71,-5 1.96,5, body extent -3,-4.95 3,4.95, height 1.75
Sot-23 [mm] "TRANS NPN 40V 0.6A SOT23"
  rect 0.82x0.92 smd: 1(-0.95,-1) 2(0.95,-1) 3(0,1)
  silkscreen extent -1.68,-1.3 1.55,0.81, body extent -1.5,-1.25 1.5,1.25, height 1.05
SOT-23 [mm] "TRANS NPN 40V 0.6A SOT23"
  rect 0.82x0.92 smd: 1(-0.95,-1) 2(0.95,-1) 3(0,1)
  silkscreen extent -1.68,-1.3 1.55,0.81, body extent -1.5,-1.25 1.5,1.25, height 1.05
SOT-363 [mm]
  rect 0.8x0.4 smd: 1(-0.97,0.65) 2(-0.97,0) 3(-0.97,-0.65) 4(0.97,-0.65) 5(0.97,0) 6(0.97,0.65)
  silkscreen extent -1.65,-1.09 0.51,1.09, body extent -1.15,-1.05 1.15,1.05, height 1
Test-point [mil]
  oct 60x60 smd: 1(0,0)
  silkscreen extent -37,-37 37,37
TSOT-23-6 [mm]
  rect 1x0.6 smd: 1(-1.2,0.95) 2(-1.2,0) 3(-1.2,-0.95) 4(1.2,-0.95) 5(1.2,0) 6(1.2,0.95)
  silkscreen extent -1.98,-1.5 0.86,1.5, body extent -1.41,-1.45 1.41,1.45, height 1
TSOT-26-6 [mm]
  rect 1x0.7 smd: 1(-1.249,0.95) 2(-1.249,0) 3(-1.249,-0.95) 4(1.249,-0.95) 5(1.249,0) 6(1.249,0.95)
  silkscreen extent -2.01,-1.52 0.76,1.52, body extent -1.42,-1.46 1.42,1.46, height 1.1
VLS5045EX-100M-H [mm]
  rect 2x4 smd: 1(-2.05,0) 2(2.05,0)
  silkscreen extent -2.65,-2.5 2.65,2.5, body extent -2.65,-2.5 2.65,2.5, height 4.5
"Voltlink Target" [mm]
  rect 0.5x1.6 smd: 1(-2.5,-1.262) 2(-1.5,-1.262) 3(-0.5,-1.262) 4(0.5,-1.262) 5(1.5,-1.262) 6(2.5,-1.262)
  rect 1.2x1.8 smd: MP1(-3.8,1.262) MP2(3.8,1.262)
  silkscreen extent -4.06,-1.68 4.06,2.17, body extent -4,-1.49 4,2.11, height 4.25
VSSOP-8(2x2.3x0.5) [mm]
  rect 0.8x0.3 smd: 1(-1.55,0.75) 2(-1.55,0.25) 3(-1.55,-0.25) 4(-1.55,-0.75) 5(1.55,-0.75) 6(1.55,-0.25) 7(1.55,0.25) 8(1.55,0.75)
  silkscreen extent -2.24,-1.04 1.07,1.04, body extent -1.55,-1 1.55,1, height 0.88
W3011 [mm]
  rect 0.8x0.65 smd: 1(1.6,0.475) 2(1.6,-0.475)
  rect 0.8x1.6 smd: 3(-1.6,0)
  silkscreen extent -0.82,-0.9 2.31,0.9, body extent -1.6,-0.8 1.6,0.8, height 1.3
X322540MPB4SI_ [mm]
  rect 1.4x1.2 smd: 1(-1.1,-0.85) 2(1.1,-0.85) 3(1.1,0.85) 4(-1.1,0.85)
  silkscreen extent -2.13,-1.3 1.65,1.3, body extent -1.6,-1.25 1.6,1.25, height 0.8
XKNANO-113 [mm]
  rect 0.7x2.1 smd: 1(-6.5,5.26) 2(6.5,5.26) 3(6.5,-6.74) 4(-6.5,-6.74)
  rect 0.8x1.14 smd: C1(0.25,6.74) C2(-2.29,6.74) C3(-4.83,6.74) C5(1.52,6.74) C6(-1.02,6.74) C7(-3.56,6.74) CD(2.47,6.74)
  rect 0x0 hole 0.75 unplated: MH(-5,-5.49) MH(3.5,-5.49)
  Keep-Out Layer region: 0.712,1.595 2.084,1.595 2.084,4.922 0.712,4.922
  Keep-Out Layer region: -1.828,1.595 -0.456,1.595 -0.456,4.922 -1.828,4.922
  Keep-Out Layer region: -4.368,1.595 -2.996,1.595 -2.996,4.922 -4.368,4.922
  Keep-Out Layer region: 0.712,-6.025 2.084,-6.025 2.084,-2.698 0.712,-2.698
  Keep-Out Layer region: -1.828,-6.025 -0.456,-6.025 -0.456,-2.698 -1.828,-2.698
  Keep-Out Layer region: -4.368,-6.025 -2.996,-6.025 -2.996,-2.698 -4.368,-2.698
  silkscreen extent -6.6,-7.95 6.58,7.06, body extent -6.55,-7.57 6.54,7.01, height 1.37
YC164-JR-070RL [mm]
  rect 0.9x0.65 smd: 1(-0.885,1.24) 4(-0.885,-1.24) 5(0.885,-1.24) 8(0.885,1.24)
  rect 0.9x0.53 smd: 2(-0.885,0.4) 3(-0.885,-0.4) 6(0.885,-0.4) 7(0.885,0.4)
  silkscreen extent -1.68,-1.72 0.88,1.72, body extent -0.8,-1.6 0.8,1.6, height 0.7

## Part data
Ant1: "ESP32 MIFA PCB ANTENNA", Item Type=Antenna, Manufacturer Part Number="ESP Patch Anttena"
ANT2: "RF ANT 1.575GHZ CHIP SOLDER SMD", Clock Frequency=1.58542GHz, Frequency=1.57542GHz, Manufacturer=Pulse, Min Frequency=1.56542GHz, Package Quantity=3000, Supplier Part Number 1=553-2582-1-ND, Category="RF Antennas", ComponentLink1Description=https://datasheet.ciiva.com/8152/+w3011-w3011a-8152997.pdf?src-supplier=Avnet, ComponentLink1URL=https://datasheet.ciiva.com/8152/+w3011-w3011a-8152997.pdf?src-supplier=Avnet, ComponentLink2Description=https://datasheet.ciiva.com/2792/+w3011-w3011a-2792615.pdf?src-supplier=Digi-Key, ComponentLink2URL=https://datasheet.ciiva.com/2792/+w3011-w3011a-2792615.pdf?src-supplier=Digi-Key, Height=0.043inch, Impedance=50R, Item Type=Antenna, Lead Free="Lead Free", Manufacturer Part Number=W3011, Mounting Technology="Surface Mount,PCB", Number of Bands=1, Packaging="Cut Tape", Pricing 1="1=1.59, 10=1.431, 25=1.35, 100=1.1502, 250=1.08, 500=0.945, 1000=0.783 (USD)", Return Loss=-12dB, RoHS=Yes, RoHS Compliant=Yes, Series=-, Stock 1=9327, Supplier 1=Digi-Key, Termination=Solder
C1 C3 C7 C9 C12 C17 C18 C19 C22 C23 C25 C32 C37 C38 C39 C40 C41 C42 C43 C44 C45 C46 C47: library part GRM155R62A104KE14D, "CAP CER 0.1UF 100V X5R 0402", Capacitance=100nF, Case Code (Imperial)=0402, Case Code (Metric)=1005, Dielectric=X5R, LCSC Part Number=C162178, Manufacturer=Murata, Max Operating Temperature=85°C, Min Operating Temperature=-55°C, Package Quantity=10000, Tolerance=10%, Voltage Rating=100V, Case/Package=0402, Category="Ceramic Capacitors", ComponentLink1Description=http://www.farnell.com/datasheets/2079151.pdf?src-supplier=Farnell, ComponentLink1URL=http://www.farnell.com/datasheets/2079151.pdf?src-supplier=Farnell, ComponentLink2Description=http://www.mouser.com/ds/2/281/c02e-2905.pdf?src-supplier=Mouser, ComponentLink2URL=http://www.mouser.com/ds/2/281/c02e-2905.pdf?src-supplier=Mouser, ComponentLink3Description=http://www.farnell.com/datasheets/2079151.pdf?src-supplier=Element14, ComponentLink3URL=http://www.farnell.com/datasheets/2079151.pdf?src-supplier=Element14, ComponentLink4Description=http://search.murata.co.jp/Ceramy/image/img/A01X/G101/ENG/GRM155R62A104KE14-01.pdf?src-supplier=Digi-Key, ComponentLink4URL=http://search.murata.co.jp/Ceramy/image/img/A01X/G101/ENG/GRM155R62A104KE14-01.pdf?src-supplier=Digi-Key, ComponentLink5Description=http://www.farnell.com/datasheets/2079151.pdf?src-supplier=Newark, ComponentLink5URL=http://www.farnell.com/datasheets/2079151.pdf?src-supplier=Newark, Height=0.5mm, Item Type=Capacitor, Lead Free="Lead Free", Length=0.039inch, Manufacturer Part Number=GRM155R62A104KE14D, Mount="Surface Mount", Packaging="Tape and Reel", Pricing 1="10000=0.00500, 20000=0.00410, 30000=0.00390, 50000=0.00370, 100000=0.00300 (USD)", Reach SVHC Compliant=Yes, RoHS=Yes, RoHS Compliant=Yes, Series=GRM, Stock 1=870000, Supplier 1="Arrow Electronics", Supplier Part Number 1=GRM155R62A104KE14D, Termination=SMD/SMT, Thickness=0.022inch, Voltage Rating (DC)=100V, Weight=0.000212oz, Width=0.02inch
C2 C8 C15 C20: library part CL05A106MP5NUNC, "CAP CER 10UF 10V X5R 0402", Case Code (Imperial)=0402, Case Code (Metric)=1005, Dielectric=X5R, LCSC Part Number=C315248, Manufacturer=Samsung, Max Operating Temperature=85°C, Min Operating Temperature=-55°C, Package Quantity=1, Tolerance=20%, Voltage Rating=10V, Capacitance=10uF, Case/Package=0402, Category="Ceramic Capacitors", ComponentLink1Description=https://datasheet.ciiva.com/25721/cl05a106mp5nunc-25721584.pdf?src-supplier=Digi-Key, ComponentLink1URL=https://datasheet.ciiva.com/25721/cl05a106mp5nunc-25721584.pdf?src-supplier=Digi-Key, ComponentLink2Description=https://datasheet.ciiva.com/26838/getdatasheetpartid-745310-26838170.pdf?src-supplier=Verical, ComponentLink2URL=https://datasheet.ciiva.com/26838/getdatasheetpartid-745310-26838170.pdf?src-supplier=Verical, Construction=Flat, Contact Plating=Tin, Depth=0.5mm, Item Type=Capacitor, Lead Free="Lead Free", Length=1mm, Manufacturer Part Number=CL05A106MP5NUNC, Mount="Surface Mount", Packaging="Tape and Reel", Pricing 1="10000=0.02537 (USD)", Radiation Hardening=No, RoHS=Yes, RoHS Compliant=Yes, Series=CL, Stock 1=1729850, Supplier 1=Avnet, Supplier Part Number 1=CL05A106MP5NUNC, Termination=Wraparound, Thickness=0.028inch, Width=0.02inch
C4: library part GRM1555C1H101JA01D, "CAP CER 100PF 50V C0G/NP0 0402", Case Code (Imperial)=0402, Case Code (Metric)=1005, Dielectric=C0G, LCSC Part Number=C77177, Manufacturer=Murata, Max Operating Temperature=125°C, Min Operating Temperature=-55°C, Package Quantity=1, Supplier Part Number 1=81-GRM1555C1H101JA1D, Tolerance=5%, Voltage=50V, Capacitance=100pF, Case/Package=0402, Category="Ceramic Capacitors", ComponentLink1Description=https://datasheet.ciiva.com/11786/0900766b80ef921d-11786069.pdf?src-supplier=RSComponents, ComponentLink1URL=https://datasheet.ciiva.com/11786/0900766b80ef921d-11786069.pdf?src-supplier=RSComponents, ComponentLink2Description=https://datasheet.ciiva.com/18184/getdatasheetpartid-199957-18184175.pdf?src-supplier=Verical, ComponentLink2URL=https://datasheet.ciiva.com/18184/getdatasheetpartid-199957-18184175.pdf?src-supplier=Verical, ComponentLink3Description=https://datasheet.ciiva.com/29200/453557-da-01-en-vs-kondensator-0402-29200111.pdf?src-supplier=Conrad, ComponentLink3URL=https://datasheet.ciiva.com/29200/453557-da-01-en-vs-kondensator-0402-29200111.pdf?src-supplier=Conrad, ComponentLink4Description=https://datasheet.ciiva.com/6271/partnumbering-e-01-6271071.pdf?src-supplier=Digi-Key, ComponentLink4URL=https://datasheet.ciiva.com/6271/partnumbering-e-01-6271071.pdf?src-supplier=Digi-Key, ComponentLink5Description=https://datasheet.ciiva.com/16440/product-16440566.pdf?src-supplier=Future+Electronics, ComponentLink5URL=https://datasheet.ciiva.com/16440/product-16440566.pdf?src-supplier=Future+Electronics, Construction=Flat, Depth=0.5mm, Height=0.5mm, Lead Free="Lead Free", Length=1mm, Manufacturer Part Number=GRM1555C1H101JA01D, Material=Ceramic, Mount="Surface Mount", Packaging="Tape and Reel", Pricing 1="1=0.10000, 10=0.01000, 50=0.01000, 100=0.00900, 500=0.00600, 1000=0.00500, 2500=0.00400, 10000=0.00300, 50000=0.00200 (USD)", Radiation Hardening=No, REACH SVHC="No SVHC", RoHS=Yes, RoHS Compliant=Yes, Series=GRM, Stock 1=2073105, Supplier 1=Mouser, Termination=SMD/SMT, Thickness=0.022inch, Voltage Rating=50V, Voltage Rating (DC)=50V, Width=0.02inch
C5 C6 C10 C11: library part 12063D226KAT2A, "CAP CER 22UF 25V X5R 1206", Case Code (Imperial)=1206, Case Code (Metric)=3216, Dielectric=X5R, LCSC Part Number=C2167862, Manufacturer="Kyocera AVX", Max Operating Temperature=85°C, Min Operating Temperature=-55°C, Package Quantity=2500, Supplier Part Number 1=478-9946-1-ND, Tolerance=10%, Voltage Rating=25V, Capacitance=22uF, Case/Package=1206, ComponentLink1Description=http://www.avx.com/docs/Catalogs/cx5r.pdf?src-supplier=Future+Electronics, ComponentLink1URL=http://www.avx.com/docs/Catalogs/cx5r.pdf?src-supplier=Future+Electronics, Depth=1.6mm, Height=0.07mm, Item Type=Capacitor, Lead Free="Lead Free", Length=3.2mm, Manufacturer Part Number=12063D226KAT2A, Mount="Surface Mount", Packaging="Tape and Reel", Pricing 1="1=1.18, 10=0.895, 50=0.7434, 100=0.6401, 500=0.49556, 1000=0.42673 (USD)", RoHS Compliant=Yes, Series=-, Stock 1=135583, Supplier 1=Digi-Key, Termination=SMD/SMT, Thickness=0.071inch, Voltage Rating (DC)=25V, Width=0.063inch
C13 C16 C21 C24 C33: library part UMK105CBJ105MV-F, "CAP CER 1UF 50V X5R 0402", LCSC Part Number=C2880413, Manufacturer="Taiyo Yuden", Supplier Part Number 1=587-6278-1-ND, ComponentLink1Description=http://www.farnell.com/datasheets/2801300.pdf?src-supplier=Newark, ComponentLink1URL=http://www.farnell.com/datasheets/2801300.pdf?src-supplier=Newark, ComponentLink2Description=http://www.farnell.com/datasheets/2801300.pdf?src-supplier=Farnell, ComponentLink2URL=http://www.farnell.com/datasheets/2801300.pdf?src-supplier=Farnell, ComponentLink3Description="https://ds.yuden.co.jp/TYCOMPAS/ut/detail?pn=UMK105CBJ105MV-F &amp;u=M&src-supplier=Digi-Key", ComponentLink3URL="https://ds.yuden.co.jp/TYCOMPAS/ut/detail?pn=UMK105CBJ105MV-F &amp;u=M&src-supplier=Digi-Key", Item Type=Capacitor, Lead Free="Lead Free", Manufacturer Part Number=UMK105CBJ105MV-F, Pricing 1="1=0.27, 10=0.184, 50=0.1224, 100=0.104, 500=0.07342, 1000=0.06424, 2500=0.06118, 5000=0.05659 (USD)", RoHS Compliant=Yes, Stock 1=412061, Supplier 1=Digi-Key
C14: library part CC0402KRX7R9BB103, "CAP CER 10000PF 50V X7R 0402", Case Code (Imperial)=0402, Case Code (Metric)=1005, Dielectric=X7R, LCSC Part Number=C60133, Manufacturer=Yageo, Max Operating Temperature=125°C, Min Operating Temperature=-55°C, Package Quantity=1, Resistor Type=Ceramic, Tolerance=10%, Voltage=50V, Capacitance=10nF, Case/Package=0402, Category="Ceramic Capacitors", ComponentLink1Description=https://datasheet.ciiva.com/11788/0900766b8079c870-11788375.pdf?src-supplier=RSComponents, ComponentLink1URL=https://datasheet.ciiva.com/11788/0900766b8079c870-11788375.pdf?src-supplier=RSComponents, ComponentLink2Description=https://datasheet.ciiva.com/26862/getdatasheetpartid-138248-26862642.pdf?src-supplier=Verical, ComponentLink2URL=https://datasheet.ciiva.com/26862/getdatasheetpartid-138248-26862642.pdf?src-supplier=Verical, ComponentLink3Description=https://datasheet.ciiva.com/7978/1489800-7978093.pdf?src-supplier=Element14, ComponentLink3URL=https://datasheet.ciiva.com/7978/1489800-7978093.pdf?src-supplier=Element14, ComponentLink4Description=https://datasheet.ciiva.com/28450/1489800-28450377.pdf?src-supplier=Element14, ComponentLink4URL=https://datasheet.ciiva.com/28450/1489800-28450377.pdf?src-supplier=Element14, ComponentLink5Description=https://datasheet.ciiva.com/176/mlccorderingcode-176349.pdf?src-supplier=Digi-Key, ComponentLink5URL=https://datasheet.ciiva.com/176/mlccorderingcode-176349.pdf?src-supplier=Digi-Key, ComponentLink6Description=https://datasheet.ciiva.com/176/mlccorderingcode-176348.pdf?src-supplier=Digi-Key, ComponentLink6URL=https://datasheet.ciiva.com/176/mlccorderingcode-176348.pdf?src-supplier=Digi-Key, ComponentLink7Description=https://datasheet.ciiva.com/176/mlccorderingcode-176350.pdf?src-supplier=Digi-Key, ComponentLink7URL=https://datasheet.ciiva.com/176/mlccorderingcode-176350.pdf?src-supplier=Digi-Key, Depth=0.5mm, Halogen Free="Halogen Free", Height=0.5mm, Item Type=Capacitor, Lead Free="Lead Free", Length=1mm, Manufacturer Part Number=CC0402KRX7R9BB103, Mount="Surface Mount", Packaging="Tape and Reel", Pricing 1="10000=0.00178 (USD)", Radiation Hardening=No, Reach SVHC Compliant=Yes, RoHS=Yes, RoHS Compliant=Yes, Series=CC, Stock 1=995000, Supplier 1=Avnet, Supplier Part Number 1=CC0402KRX7R9BB103, Termination=SMD/SMT, Thickness=0.022inch, Voltage Rating=50V, Voltage Rating (DC)=50V, Width=0.02inch
C26 C27 C34 C35 C36: library part CC0402JRNPO9BN220, "CAP CER 22PF 50V C0G/NPO 0402", Case Code (Imperial)=0402, Case Code (Metric)=1005, Dielectric=C0G, Dielectric Material=Ceramic, Insulation Resistance=100GR, LCSC Part Number=C106203, Manufacturer=Yageo, Max Operating Temperature=125°C, Min Operating Temperature=-55°C, Package Quantity=1, Supplier Part Number 1=9105957, Temperature Coefficient=30ppm/°C, Tolerance=5%, Voltage=50V, Case/Package=0402, Category="Ceramic Capacitors", ComponentLink1Description=https://datasheet.ciiva.com/5789/1443161-5789509.pdf?src-supplier=Farnell, ComponentLink1URL=https://datasheet.ciiva.com/5789/1443161-5789509.pdf?src-supplier=Farnell, ComponentLink2Description=https://datasheet.ciiva.com/8033/1443161-8033606.pdf?src-supplier=Element14, ComponentLink2URL=https://datasheet.ciiva.com/8033/1443161-8033606.pdf?src-supplier=Element14, ComponentLink3Description=https://datasheet.ciiva.com/7656/1132289-7656615.pdf?src-supplier=Element14, ComponentLink3URL=https://datasheet.ciiva.com/7656/1132289-7656615.pdf?src-supplier=Element14, ComponentLink4Description=https://datasheet.ciiva.com/8033/1443161-8033607.pdf?src-supplier=Element14, ComponentLink4URL=https://datasheet.ciiva.com/8033/1443161-8033607.pdf?src-supplier=Element14, ComponentLink5Description=https://datasheet.ciiva.com/8033/1443161-8033605.pdf?src-supplier=Element14, ComponentLink5URL=https://datasheet.ciiva.com/8033/1443161-8033605.pdf?src-supplier=Element14, ComponentLink6Description=https://datasheet.ciiva.com/143/mlccorderingcode-143987.pdf?src-supplier=Digi-Key, ComponentLink6URL=https://datasheet.ciiva.com/143/mlccorderingcode-143987.pdf?src-supplier=Digi-Key, ComponentLink7Description=https://datasheet.ciiva.com/143/mlccorderingcode-143986.pdf?src-supplier=Digi-Key, ComponentLink7URL=https://datasheet.ciiva.com/143/mlccorderingcode-143986.pdf?src-supplier=Digi-Key, ComponentLink8Description=https://datasheet.ciiva.com/143/mlccorderingcode-143988.pdf?src-supplier=Digi-Key, ComponentLink8URL=https://datasheet.ciiva.com/143/mlccorderingcode-143988.pdf?src-supplier=Digi-Key, ComponentLink9Description=https://datasheet.ciiva.com/5425/upy-gp-np0-16v-to-50v-8-5425483.pdf?src-supplier=Mouser, ComponentLink9URL=https://datasheet.ciiva.com/5425/upy-gp-np0-16v-to-50v-8-5425483.pdf?src-supplier=Mouser, ComponentLink10Description=https://datasheet.ciiva.com/15189/getdatasheetpartid-370074-15189117.pdf?src-supplier=Verical, ComponentLink10URL=https://datasheet.ciiva.com/15189/getdatasheetpartid-370074-15189117.pdf?src-supplier=Verical, Depth=0.5mm, Height=0.5mm, Item Type=Capacitor, Lead Free="Lead Free", Length=1mm, Manufacturer Part Number=CC0402JRNPO9BN220, Mounting Technology="Surface Mount", Packaging="Tape and Reel", Pins=2, Pricing 1="10000=0.00220, 40000=0.00210, 150000=0.00200, 400000=0.00190, 1000000=0.00180 (USD)", Radiation Hardening=No, Reach SVHC Compliant=Yes, Resistor Type=Ceramic, RoHS=Yes, RoHS Compliant=Yes, Series=CC, Stock 1=200000, Supplier 1="Future Electronics", Termination=SMD/SMT, Thickness=0.022inch, Voltage Rating=50V, Voltage Rating (DC)=50V, Width=0.02inch
C28: library part CC0603CRNPO9BN2R2, "CAP CER 2.2PF 50V C0G/NPO 0603", Case Code (Imperial)=0603, Case Code (Metric)=1608, Dielectric=C0G, Insulation Resistance=100GR, LCSC Part Number=C282246, Manufacturer=Yageo, Max Operating Temperature=125°C, Min Operating Temperature=-55°C, Package Quantity=4000, Supplier Part Number=7987647, Temperature Coefficient=30ppm/°C, Tolerance=5%, Voltage=50V, Case/Package=0603, Category="Ceramic Capacitors", ComponentLink1Description=https://datasheet.ciiva.com/11786/0900766b8079c870-11786437.pdf?src-supplier=Rs, ComponentLink1URL=https://datasheet.ciiva.com/11786/0900766b8079c870-11786437.pdf?src-supplier=Rs, ComponentLink2Description=https://datasheet.ciiva.com/5425/upy-gp-np0-16v-to-50v-8-5425498.pdf?src-supplier=Mouser, ComponentLink2URL=https://datasheet.ciiva.com/5425/upy-gp-np0-16v-to-50v-8-5425498.pdf?src-supplier=Mouser, ComponentLink3Description=https://datasheet.ciiva.com/8033/1443161-8033691.pdf?src-supplier=Element14, ComponentLink3URL=https://datasheet.ciiva.com/8033/1443161-8033691.pdf?src-supplier=Element14, ComponentLink4Description=https://datasheet.ciiva.com/8033/1443161-8033688.pdf?src-supplier=Element14, ComponentLink4URL=https://datasheet.ciiva.com/8033/1443161-8033688.pdf?src-supplier=Element14, ComponentLink5Description=https://datasheet.ciiva.com/11586/upy-gp-np0-16v-to-50v-8-11586441.pdf?src-supplier=Avnet, ComponentLink5URL=https://datasheet.ciiva.com/11586/upy-gp-np0-16v-to-50v-8-11586441.pdf?src-supplier=Avnet, Depth=0.8mm, Height=0.8mm, Item Type=Capacitor, Lead Free="Lead Free", Length=1.6mm, Manufacturer Part Number=CC0603CRNPO9BN2R2, Mounting Technology="Surface Mount", Packaging="Tape and Reel", Pins=2, Pricing="4000=0.0053, 16000=0.005, 60000=0.0047, 160000=0.0045, 400000=0.0043 (USD)", Radiation Hardening=No, Reach SVHC Compliant=Unknown, RoHS=Yes, RoHS Compliant=Yes, Series=CC, Stock=124000, Supplier="Future Electronics", Termination=SMD/SMT, Thickness=0.035inch, Voltage Rating=50V, Voltage Rating (DC)=50V, Width=0.031inch
C29: library part GRM1555C1E330JA01D, "CAP CER 33PF 25V C0G/NP0 0402", Case Code (Imperial)=0402, Case Code (Metric)=1005, Dielectric=C0G, LCSC Part Number=C441758, Manufacturer=Murata, Max Operating Temperature=125°C, Min Operating Temperature=-55°C, Package Quantity=1, Supplier Part Number 1=490-6177-1-ND, Tolerance=5%, Voltage=25V, Capacitance=33pF, Case/Package=0402, ComponentLink1Description=https://www.murata.com/~/media/webrenewal/support/library/catalog/products/capacitor/mlcc/c02e.ashx?la=en-us&src-supplier=Digi-Key, ComponentLink1URL=https://www.murata.com/~/media/webrenewal/support/library/catalog/products/capacitor/mlcc/c02e.ashx?la=en-us&src-supplier=Digi-Key, ComponentLink2Description=http://www.mouser.com/ds/2/281/c02e-2905.pdf?src-supplier=Mouser, ComponentLink2URL=http://www.mouser.com/ds/2/281/c02e-2905.pdf?src-supplier=Mouser, ComponentLink3Description=http://psearch.murata.com/capacitor/product/GRM1555C1E330JA01%23.pdf?src-supplier=Avnet, ComponentLink3URL=http://psearch.murata.com/capacitor/product/GRM1555C1E330JA01%23.pdf?src-supplier=Avnet, Construction=Flat, Depth=0.5mm, Height=0.5mm, Lead Free="Lead Free", Length=1mm, Manufacturer Part Number=GRM1555C1E330JA01D, Mount="Surface Mount", Packaging="Tape and Reel", Pricing 1="1=0.1, 10=0.034, 50=0.0184, 100=0.0151, 500=0.01078, 1000=0.00847, 2500=0.0077, 5000=0.00708 (USD)", Radiation Hardening=No, RoHS Compliant=Yes, Series=GRM, Stock 1=250773, Supplier 1=Digi-Key, Termination=SMD/SMT, Thickness=0.022inch, Voltage Rating=25V, Voltage Rating (DC)=25V, Width=0.02inch
C30: library part CC0402KRX5R7BB223, "CAP CER 0.022UF 16V X5R 0402", Case Code (Imperial)=0402, Case Code (Metric)=1005, Dielectric=X5R, LCSC Part Number=C541399, Manufacturer=Yageo, Max Operating Temperature=85°C, Min Operating Temperature=-55°C, Supplier Part Number 1=603-CC402KRX5R7BB223, Tolerance=10%, Voltage Rating=16V, Capacitance=22nF, Case/Package=0402, Category="Ceramic Capacitors", ComponentLink1Description=http://www.yageo.com/exep/pages/download/literatures/ProductSelectionGuide%202014_Final_2.pdf?src-supplier=Digi-Key, ComponentLink1URL=http://www.yageo.com/exep/pages/download/literatures/ProductSelectionGuide%202014_Final_2.pdf?src-supplier=Digi-Key, ComponentLink2Description=http://www.yageo.com/documents/recent/UPY-GPHC_X5R_4V-to-50V_25.pdf?src-supplier=Digi-Key, ComponentLink2URL=http://www.yageo.com/documents/recent/UPY-GPHC_X5R_4V-to-50V_25.pdf?src-supplier=Digi-Key, Halogen Free="Halogen Free", Lead Free="Lead Free", Length=0.039inch, Manufacturer Part Number=CC0402KRX5R7BB223, Mount="Surface Mount", Packaging="Tape and Reel", Pricing 1="1=0.10000, 10=0.05600, 50=0.05600, 100=0.02500, 1000=0.01400, 10000=0.01000 (USD)", RoHS=Yes, RoHS Compliant=Yes, Stock 1=31160, Supplier 1=Mouser, Thickness=0.022inch, Voltage Rating (DC)=16V, Width=0.02inch
C31: library part TLJB227M006R0500, "CAP TANT 220UF 20% 6.3V SMD", Case Code (Imperial)=1411, Case Code (Metric)=3528, Case/Package=1210, Dielectric Material=Tantalum, ESR (Equivalent Series Resistance)=500mR, LCSC Part Number=C30242, Leakage Current=13.2uA, Manufacturer="Kyocera AVX", Max Operating Temperature=125°C, Min Operating Temperature=-55°C, Package Quantity=2000, Ripple Current=412mA, Tolerance=20%, Voltage Rating=6.3V, Category="Tantalum Capacitors", ComponentLink1Description=https://datasheet.ciiva.com/7773/tlj-7773835.pdf?src-supplier=Element14, ComponentLink1URL=https://datasheet.ciiva.com/7773/tlj-7773835.pdf?src-supplier=Element14, ComponentLink2Description=https://datasheet.ciiva.com/7773/tlj-7773836.pdf?src-supplier=Element14, ComponentLink2URL=https://datasheet.ciiva.com/7773/tlj-7773836.pdf?src-supplier=Element14, ComponentLink3Description=https://datasheet.ciiva.com/12911/tlj-35067-12911143.pdf?src-supplier=Mouser, ComponentLink3URL=https://datasheet.ciiva.com/12911/tlj-35067-12911143.pdf?src-supplier=Mouser, ComponentLink4Description=https://datasheet.ciiva.com/11229/tlj-11229391.pdf?src-supplier=Avnet, ComponentLink4URL=https://datasheet.ciiva.com/11229/tlj-11229391.pdf?src-supplier=Avnet, ComponentLink5Description=https://datasheet.ciiva.com/6238/tlj-6238526.pdf?src-supplier=Digi-Key, ComponentLink5URL=https://datasheet.ciiva.com/6238/tlj-6238526.pdf?src-supplier=Digi-Key, Construction=Flat, Depth=2.8mm, Features="General Purpose", Height=2.1mm, Height - Seated (Max)=0.083inch, Item Type=Capacitor, Length=3.5mm, Manufacturer Part Number=TLJB227M006R0500, Mounting Technology="Surface Mount", Packaging="Tape and Reel", Pins=2, Polarity=Polar, Pricing 1="2000=0.5308 (USD)", Radiation Hardening=No, Reach SVHC Compliant=No, RoHS=Yes, RoHS Compliant=Yes, Series=TLJ, Stock 1=2000, Supplier 1="Arrow Electronics", Supplier Part Number 1=TLJB227M006R0500, Termination=SMD/SMT, Voltage Rating (DC)=6.3V, Width=2.8mm
C48: library part CC0201CRNPO9BN2R7, "CAP CER 2.7PF 50V C0G/NPO 0201", Case Code (Imperial)=0201, Case Code (Metric)=0603, Dielectric=C0G, LCSC Part Number=C325439, Manufacturer=Yageo, Max Operating Temperature=125°C, Min Operating Temperature=-55°C, Voltage Rating=50V, Case/Package=0201, Category="Ceramic Capacitors", ComponentLink1Description=https://datasheet.ciiva.com/13208/upy-gp-np0-16v-to-50v-8-13208314.pdf?src-supplier=Mouser, ComponentLink1URL=https://datasheet.ciiva.com/13208/upy-gp-np0-16v-to-50v-8-13208314.pdf?src-supplier=Mouser, Item Type=Capacitor, Length=0.024inch, Manufacturer Part Number=CC0201CRNPO9BN2R7, Mounting Technology="Surface Mount", Packaging="Tape and Reel", Pricing="15000=0.0017 (USD)", RoHS=Yes, RoHS Compliant=Yes, Series=CC, Stock=15000, Supplier=Avnet, Supplier Part Number=CC0201CRNPO9BN2R7, Termination=SMD/SMT, Thickness=0.013inch, Voltage Rating (DC)=50V, Weight=6E-06oz, Width=0.012inch
C49: library part CC0201BRNPO9BN4R7, "CAP CER 4.7PF 50V C0G/NPO 0201", Case/Package=0201, LCSC Part Number=C505471, Manufacturer=Yageo, Max Operating Temperature=125°C, Min Operating Temperature=-55°C, Voltage Rating=50V, Category="Ceramic Capacitors", ComponentLink1Description=https://www.yageo.com/upload/media/product/productsearch/datasheet/mlcc/UPY-GP_NP0_16V-to-50V_18.pdf?src-supplier=Digi-Key, ComponentLink1URL=https://www.yageo.com/upload/media/product/productsearch/datasheet/mlcc/UPY-GP_NP0_16V-to-50V_18.pdf?src-supplier=Digi-Key, ComponentLink2Description=http://www.yageo.com/documents/recent/UPY-GP_NP0_16V-to-50V_16.pdf?src-supplier=Digi-Key, ComponentLink2URL=http://www.yageo.com/documents/recent/UPY-GP_NP0_16V-to-50V_16.pdf?src-supplier=Digi-Key, Item Type=Capacitor, Length=0.024inch, Manufacturer Part Number=CC0201BRNPO9BN4R7, Mounting Technology="Surface Mount", Packaging="Tape and Reel", Pricing="15000=0.0023 (USD)", RoHS=Yes, RoHS Compliant=Yes, Series=CC, Stock=210000, Supplier="Arrow Electronics", Supplier Part Number=CC0201BRNPO9BN4R7, Thickness=0.013inch, Width=0.012inch
D1: "58.1V 40V 36V Bi-Directional SMB(DO-214AA) TVS ROHS", LCSC Part Number=C556189, Manufacturer="Slkor(SLKORMICRO Elec.)", Package=SMB(DO-214AA), ComponentLink1Description=LCSC, ComponentLink1URL=https://www.lcsc.com/product-detail/span-style-background-color-ff0-TVS-span_Slkor-SLKORMICRO-Elec-SMBJ36CA_C556189.html, Item Type=Diode, Manufacturer Part Number=SMBJ36CA